# Altium PCB DT10966_MOTOR_CONTROLLER.PcbDoc (part 8 of 8)
Units mm, origin at the board's own origin, x right, y up, seen from the top; angles counter-clockwise.
Board outline 300 x 19 mm, 10 copper layers (Top Layer, Layer 2 GND, Layer 3 SIG, Layer 4 GND, Layer 5 PWR, Layer 6 PWR, Layer 7 GND, Layer 8 SIG, Layer 9 GND, Bottom Layer), stack 2.418 mm thick; 745 components, 446 nets, 2132 pads, 1222 vias.
Unrouted connection lines stored in the file: 3.
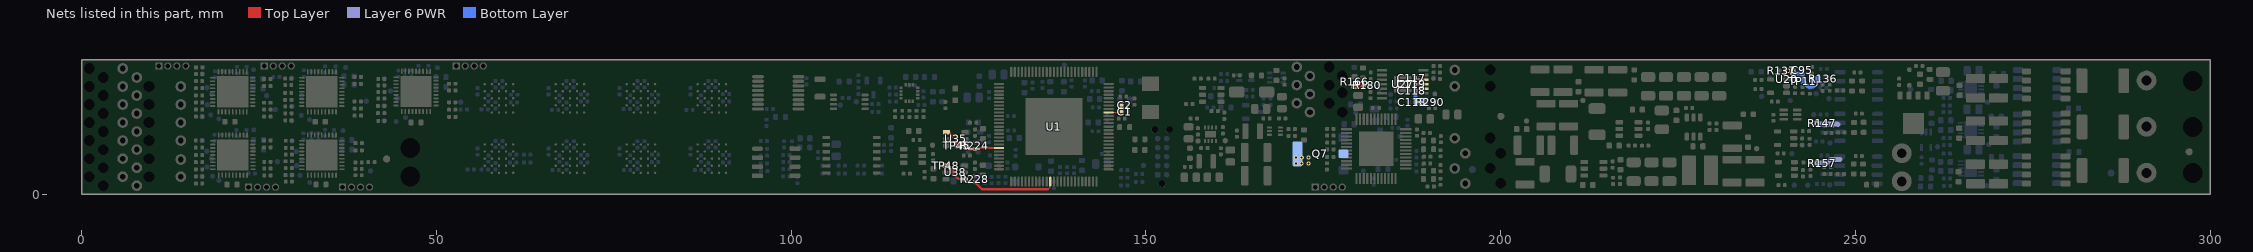
[diagram p15: the nets of this part, all layers, seen from the top]

## Via types
v1: diameter 0.6, hole 0.3, Top Layer to Bottom Layer, tented both sides, 726 vias
v2: diameter 0.4, hole 0.2, Top Layer to Bottom Layer, tented both sides, 493 vias
v3: diameter 0.5, hole 0.2, Top Layer to Bottom Layer, tented both sides, 3 vias

## Nets (pads, with @x,y where several pads share a name; then routed paths per layer and width w, separated by ;. In a path a pad name is that pad's centre, name@x,y a point inside that pad or via, vN(x,y) a via of type N, cw(c..) or ccw(c..) an arc to the next point about the centre after c; other vN are vias at no path point) (continued)
VPWR1: C113.2 C117.2 C118.2 C119.2 Q7.2 Q7.4 R166.2 R180.2 R290.1 U27.10 U27.11 U27.12 | length 10
  Top Layer w0.3: v1(187.901,15.5) 187.911,15.51 189.115,15.51 U27.11@189.126,15.52 ; v1(187.901,16.392) 187.982,16.392 188.176,16.198 189.098,16.198 U27.12@189.126,16.17 ; v1(187.958,14.6) 188.039,14.6 188.282,14.842 189.098,14.842 U27.10@189.126,14.87
  Top Layer w0.6: R166.2@179.345,15.154 R166.2@179.4,15.154 ; R166.2@179.397,15.151 179.46,15.214 179.65,15.214 179.699,15.263 R180.2@180.653,15.263
  Bottom Layer w0.6: v1(187.901,16.392) v1(187.901,16.392) 187.899,14.658 v1(187.958,14.6) 187.958,14.52 187.974,14.504 C113.2@187.974,12.967 R290.1@189.358,12.967
  other v1: 171.138,4.359 171.926,4.359 172.887,4.359 171.15,5.184 171.939,5.196 172.887,5.196 179.373,15.154 180.67,15.28
VREF: C95.2 R136.1 R137.2 R147.1 R157.1 TP11.1 U20.2 | length 14
  Top Layer w0.4: R137.2@240.03,17.423 v1(240.503,17.423) 240.976,17.423 241.166,17.233 v1(241.221,17.233)
  Layer 6 PWR w0.7: v1(244.563,9.947) 247.406,9.947 247.535,9.819 ; v1(244.647,4.457) 245.99,4.457 246.43,4.897 247.772,4.897
  Bottom Layer w0.6: v1(240.503,17.423) 241.221,17.423 v1(241.221,17.233) 241.221,17.133 241.321,17.033 C95.2@242.499,17.033 242.514,17.019 242.514,15.989 TP11.1@242.528,15.974 ; TP11.1@242.528,15.953 242.563,15.953 243.309,15.207 243.997,15.207 v1@244.375,15.586 ; v1@244.443,15.758 244.664,15.978 244.664,16.237 R136.1@244.724,16.297
  other v1: 244.305,15.515
VREFHIA: R224.2 TP45.1 U1.19 U35.1 U35.4 | length 9
  Top Layer w0.3: R224.2@125.896,6.402 125.901,6.402 126.036,6.537 U1.19@129.286,6.537
  Top Layer w0.4: U35.1@121.888,8.773 121.993,8.669 122.315,8.669 123.289,7.695 123.289,6.881 v1(123.327,6.843) U35.4@124.476,6.843 124.679,6.843 124.784,6.738 124.784,6.637 125.018,6.402 R224.2@125.896,6.402
VREFHIB: R228.2 TP48.1 U1.37 U38.1 U38.4 | length 17.3
  Top Layer w0.15: 136.205,0.714 136.504,1.013 136.504,1.805 U1.37@136.511,1.812
  Top Layer w0.3: v2(121.809,4.007) 121.809,4.042 U38.1@121.802,4.049 122.005,4.049 122.725,3.33 122.769,3.33 122.769,2.972 123.577,2.163 124.345,2.163 U38.4@124.39,2.119 124.594,2.119 125.011,1.702 R228.2@125.889,1.702 125.894,1.702 126.883,0.714 136.205,0.714
VSSOSC: C1.2 C2.2 U1.67 | length 2.7
  Top Layer w0.15: U1.67@144.736,11.537 144.765,11.566 146.449,11.566 146.542,11.659 C2.2@146.542,12.533
pads on no net: J1. J1.6 U1.13 U1.27 U1.28 U1.29 U1.30 U1.31 U1.32 U1.33 U1.42 U1.43 U2.A2 U2.A3 U2.A5 U2.B1 U2.B5 U2.C1 U2.C3 U2.C5 U2.D1 U2.D5 U2.E1 U2.E2 U2.E3 U2.E4 U2.E5 U3.A2 U3.A3 U3.A5 U3.B1 U3.B5 U3.C1 U3.C3 U3.C5 U3.D1 U3.D5 U3.E1 U3.E2 U3.E3 U3.E4 U3.E5 U4.A2 U4.A3 U4.A5 U4.B1 U4.B5 U4.C1 U4.C3 U4.C5 U4.D1 U4.D5 U4.E1 U4.E2 U4.E3 U4.E4 U4.E5 U5.A2 U5.A3 U5.A5 U5.B1 U5.B5 U5.C1 U5.C3 U5.C5 U5.D1 U5.D5 U5.E1 U5.E2 U5.E3 U5.E4 U5.E5 U7.A2 U7.A3 U7.A5 U7.B1 U7.B5 U7.C1 U7.C3 U7.C5 U7.D1 U7.D5 U7.E1 U7.E2 U7.E3 U7.E4 U7.E5 U8.A2 U8.A3 U8.A5 U8.B1 U8.B5 U8.C1 U8.C3 U8.C5 U8.D1 U8.D5 U8.E1 U8.E2 U8.E3 U8.E4 U8.E5 U9.A2 U9.A3 U9.A5 U9.B1 U9.B5 U9.C1 U9.C3 U9.C5 U9.D1 U9.D5 U9.E1 U9.E2 U9.E3 U9.E4 U9.E5 U10.A2 U10.A3 U10.A5 U10.B1 U10.B5 U10.C1 U10.C3 U10.C5 U10.D1 U10.D5 U10.E1 U10.E2 U10.E3 U10.E4 U10.E5 U12.5 U13.9 U14.1 U14.12 U14.13 U14.14 U19.4 U22.4 U25.4 U27.7 U27.8 U28.5 U28.6 U28.7 U28.8 U28.9 U28.17 U28.18 U28.19 U28.29 U28.30 U28.31 U28.32 U28.33 U28.34 U28.38 U28.39 U28.40 U28.41 U28.42 U29.7 U29.12 U29.24 U29.25 U29.26 U29.27 U29.33 U29.36 U39.7 U39.12 U39.24 U39.25 U39.26 U39.27 U39.33 U39.36 U40.7 U40.12 U40.24 U40.25 U40.26 U40.27 U40.33 U40.36 U41.7 U41.12 U41.24 U41.25 U41.26 U41.27 U41.33 U41.36 U42.7 U42.12 U42.24 U42.25 U42.26 U42.27 U42.33 U42.36 Z1.1 Z2.1 Z3.1 Z4.1 Z5.1 Z6.1

## Polygon pours and split planes (outlines as drawn)
DGND on Top Layer "DGND_L01_P104" (solid, remove dead copper, pour order 104): 169.598,19 179.682,19 179.682,0 169.599,0
DGND on Top Layer "DGND_L01_P078" (solid, remove dead copper, pour order 78): 0,19 154.995,19 155.332,18.663 155.332,-0.019 0.019,-0.019 0,0
DGND on Top Layer "DGND_3" (solid, remove dead copper, pour order 54): 154.594,19 154.594,0 172.089,0 172.089,19
GND on Top Layer "GND_L01_P080" (solid, remove dead copper, pour order 80): 201.406,19 201.464,18.942 201.464,0 178.281,0 181.033,2.752 181.033,19
NetC193_2 on Top Layer "NETC193" (solid, remove dead copper, pour order 0): 156.656,5.663 156.086,5.663 155.817,5.393 155.817,4.412 156.101,4.128 156.063,4.09 156.063,3.335 156.564,2.835 156.564,1.985 156.824,1.725 156.839,1.74 158.898,1.74 159.158,2 159.158,2.893 158.195,3.856 158.195,7.514 157.301,7.514 157.301,6.308
GND on Top Layer "GND_5" (solid, remove dead copper, pour order 64): 200.644,10.129 200.644,0 237.808,0 237.808,6.76 232.704,11.864 232.704,19 200.644,19
NetC173_1 on Top Layer "NETC173_1_L01_P002" (solid, remove dead copper, pour order 2): 216.698,9.514 216.68,9.531 212.964,9.531 212.201,8.768 212.212,8.758 212.212,7.515 213.452,6.275 215.654,6.275 215.654,8.23 216.338,8.914 216.698,8.914
DGND on Top Layer "DGND_2" (solid, remove dead copper, pour order 53): 202.581,19 219.384,19 219.384,16.851 219.403,16.832 218.282,16.832 218.282,11.623 215.11,8.451 205.441,8.451 202.581,11.31
VBAT on Top Layer "VBAT_L01_P017" (solid, remove dead copper, pour order 17): 260.924,11.585 260.907,2.793 263.7,0 278.124,0 278.124,6.382 271.183,6.382 270.002,5.201 263.938,5.185 263.767,5.356 263.767,8.31 263.983,8.526 263.767,11.585
VBAT on Top Layer "VBAT_L01_P016" (solid, remove dead copper, pour order 16): 263.979,14.231 263.979,11.428 264.217,11.19 269.73,11.19 270.83,12.29 278.064,12.29 278.064,9.389 275.713,7.037 273.127,7.037 273.127,7.362 271.936,8.553 265.216,8.553 263.724,8.553 260.924,11.353 260.924,12.924 260.625,13.286 261.513,14.231
GND on Top Layer "GND_3" (solid, remove dead copper, pour order 13): 264.078,1.922 264.364,2.209 270.124,2.209 270.882,2.967 273.007,2.967 273.007,0.951 272.871,0.815 265.185,0.815
GND on Top Layer "GND_4" (solid, remove dead copper, pour order 48): 258.831,16.525 262.941,16.525 263.303,16.887 263.303,17.985 262.886,18.402 259.241,18.402 258.824,17.985
GND on Top Layer "GND_2" (solid, remove dead copper, pour order 38): 264.143,8.063 264.43,8.349 270.19,8.349 270.597,8.756 273.072,8.756 273.072,7.091 272.715,6.734 264.462,6.734 264.148,7.049
GND on Top Layer "GND_1" (solid, remove dead copper, pour order 37): 264.198,14.074 264.485,14.36 270.245,14.36 270.651,14.767 273.127,14.767 273.127,13.102 272.77,12.745 264.517,12.745 264.203,13.06
VPWR on Top Layer "VPWR_1" (solid, remove dead copper, pour order 36): 202.068,5.15 203.098,5.15 204.018,6.07 204.018,8.112 203.271,8.859 203.271,9.489 203.949,9.489 205.162,8.276 207.511,8.276 207.511,2.613 206.576,1.678 205.808,1.678 205.808,1.689 204.157,3.34 202.942,3.34 202.068,4.215
+12V0 on Top Layer "+12V0_1" (solid, remove dead copper, pour order 35): 228.676,5.46 230.267,7.051 236.207,7.051 237.177,6.082 237.177,3.613 232.34,3.602 230.412,1.674 228.699,1.673 228.647,4.506
NetC160_1 on Top Layer "NETC160_1" (solid, remove dead copper, pour order 21): 226.865,8.552 226.865,7.635 225.51,6.279 225.51,2.595 227.465,2.595 227.465,6.362 227.475,6.371 227.465,7.635 227.465,8.552
VBAT on Top Layer "VBAT_1" (solid, remove dead copper, pour order 20): 231.675,14.584 231.675,13.403 231.113,12.841 226.61,12.841 226.21,12.441 226.515,12.135 226.515,10.422 226.499,10.422 226.364,10.287 225.978,10.287 224.825,11.44 223.811,11.44 223.496,11.125 222.237,11.125 220.975,9.864 218.983,9.864 218.983,10.464 219.256,10.737 219.256,14.023 219.799,14.566
+5V0 on Top Layer "+5V0_1" (solid, remove dead copper, pour order 3): 203.516,14.844 204.034,15.362 217.202,15.362 217.821,14.744 217.821,13.956 215.208,11.343 211.076,11.343 210.724,11.696 204.674,11.696 203.516,12.854
+3V3 on Top Layer "+3V3_DCDC" (solid, remove dead copper, pour order 19): 159.695,7.771 160.065,7.771 160.555,8.26 160.555,8.765 160.595,8.806 160.61,8.79 161.663,8.79 162.075,8.378 163.09,8.378 163.52,8.808 163.52,9.808 163.71,9.998 164.427,9.998 164.427,1.777 164.136,1.486 163.378,1.486 163.378,4.711 162.355,5.734 161.201,5.734 160.654,6.282 159.695,7.241
VBAT on Top Layer "VBAT_L01_P015" (solid, remove dead copper, pour order 15): 256.943,15.667 257.308,16.032 259.468,16.032 262.751,16.032 264.295,17.577 270.206,17.577 271.129,18.5 278.127,18.5 278.127,15.434 275.88,13.187 273.13,13.187 273.13,13.357 271.52,14.967 266.636,14.967 266.29,14.621 266.267,14.644 264.424,14.644 262.551,12.77 256.943,12.77
VIN on Top Layer "VIN_L01_P018" (solid, remove dead copper, pour order 18): 255.831,8.271 255.1,7.54 255.1,5.793 257.9,5.793 260.1,7.993 260.1,8.22
NetC70_1 on Top Layer "NETC70_1_L01_P011" (solid, remove dead copper, pour order 11): 278.891,16.612 279.691,16.612 280.732,17.653 282.09,17.653 282.09,14.621 280.668,13.199 278.891,13.199
NetC85_1 on Top Layer "NETC85_1_L01_P014" (solid, remove dead copper, pour order 14): 278.966,4.502 280.423,4.502 281.013,5.092 281.028,5.076 281.699,5.076 281.699,1.477 281.39,1.168 278.963,1.168
NetR149_2 on Top Layer "NETR149_2_L01_P010" (solid, remove dead copper, pour order 10): 287.775,5.104 290.836,5.104 291.99,3.951 291.99,2.635 290.989,1.635 287.775,1.635
NetR129_2 on Top Layer "NETR129_2_L01_P009" (solid, remove dead copper, pour order 9): 287.775,17.756 291.261,17.756 291.99,17.027 291.99,15.052 291.194,14.256 287.775,14.256
NetR139_2 on Top Layer "NETR139_2_L01_P006" (solid, remove dead copper, pour order 6): 287.775,11.256 291.261,11.256 291.99,10.527 291.99,8.552 291.194,7.756 287.775,7.756
NetC77_1 on Top Layer "NETC77_1_L01_P004" (solid, remove dead copper, pour order 4): 278.885,10.513 280.082,10.513 280.788,11.219 282.054,11.219 282.054,8.063 281.132,7.141 278.864,7.141
DGND on Layer 8 SIG "DGND_L08_P090" (solid, remove dead copper, pour order 90): 0,19 179.047,19 179.047,0 0,0
AGND on Layer 8 SIG "AGND_L08_P088" (solid, remove dead copper, pour order 88): 115.379,7.503 118.413,10.537 118.413,10.65 126.886,10.65 194.307,10.65 197.183,13.526 234.753,13.526 234.753,5.443 155.117,5.443 152.143,2.208 133.589,2.208 132.661,1.237 118.744,1.237 115.379,4.991
GND on Layer 8 SIG "GND_L08_P095" (solid, remove dead copper, pour order 95): 217.504,18.737 300,18.737 300,0 179.982,0 179.982,18.736
CVAGND on Layer 8 SIG "CVAGND_L08_P087" (solid, remove dead copper, pour order 87): 235.104,18.196 253.911,18.196 253.911,2.794 249.646,2.794 246.213,0.624 235.104,0.624
GND on Bottom Layer "GND_L10_P093" (solid, remove dead copper, pour order 93): 217.504,18.737 300,18.737 300,0 179.982,0 179.982,18.736
CVAGND on Bottom Layer "CVAGND_L10_P091" (solid, remove dead copper, pour order 91): 235.104,18.056 253.911,18.056 253.911,2.794 247.703,2.794 244.987,1.078 235.104,1.078
DGND on Bottom Layer "DGND_L10_P094" (solid, remove dead copper, pour order 94): 0,19 179.047,19 179.047,0 0,0
AGND on Bottom Layer "AGND_L10_P092" (solid, remove dead copper, pour order 92): 115.379,7.616 118.413,10.65 126.886,10.65 194.307,10.65 197.183,13.526 234.753,13.526 234.753,5.443 155.117,5.443 152.143,2.208 133.589,2.208 132.661,1.237 118.744,1.237 115.379,4.991
PGND on Bottom Layer "PGND_4" (solid, remove dead copper, pour order 56): 265.08,17.933 265.08,3.473 260.148,3.473 260.148,0 264.978,0 267.099,2.122 267.099,17.932
VPWR1 on Bottom Layer "VPWR1_1" (solid, remove dead copper, pour order 31): 170.619,7.458 171.523,8.362 175.555,8.362 177.609,6.308 178.129,6.308 178.129,5.108 177.609,5.108 175.405,2.904 171.673,2.904 170.619,3.958
GND on Bottom Layer "GND_13" (solid, remove dead copper, pour order 59): 273.37,4.536 273.365,4.531 273.365,1.183 273.083,0.9 270.364,0.9 270.219,1.045 270.227,1.053 270.227,3.766 271.008,4.547
GND on Bottom Layer "GND_12" (solid, remove dead copper, pour order 58): 273.434,10.347 273.429,10.342 273.429,6.874 273.216,6.66 270.689,6.66 270.35,7 270.362,7.012 270.362,9.745 270.964,10.347
GND on Bottom Layer "GND_11" (solid, remove dead copper, pour order 57): 273.39,16.662 273.39,13.365 272.745,12.72 270.641,12.72 270.362,12.999 270.362,16.251 270.773,16.662
NetC85_1 on Bottom Layer "NETC85_1_L10_P008" (solid, remove dead copper, pour order 8): 275.094,5.756 275.106,5.743 278.314,5.743 279.476,4.581 280.403,4.581 280.403,4.599 280.881,5.076 282.554,5.076 282.554,1.882 281.834,1.162 275.177,1.162
NetC70_1 on Bottom Layer "NETC70_1_L10_P007" (solid, remove dead copper, pour order 7): 275.113,17.915 278.388,17.915 279.444,16.86 282.484,16.86 282.484,14.503 281.264,13.283 275.179,13.283
NetC77_1 on Bottom Layer "NETC77_1_L10_P005" (solid, remove dead copper, pour order 5): 274.85,11.578 278.353,11.578 279.452,10.478 279.487,10.513 280.175,10.513 280.881,11.219 282.553,11.219 282.553,8.036 281.654,7.137 274.85,7.137
DGND on Layer 6 PWR "DGND_L06_P083" (solid, remove dead copper, pour order 83): 246.688,3.239 251.374,3.239 251.614,2.998 251.614,0.019 246.688,0.015
GND on Layer 6 PWR "GND_L06_P084" (solid, remove dead copper, pour order 84): 218.254,19 300,19 300,0 251.736,0 251.736,1.95 245.947,7.739 218.254,7.739
DGND on Layer 6 PWR "DGND_L06_P082" (solid, remove dead copper, pour order 82): -0.019,19.019 219.384,19.019 219.384,16.851 218.263,16.851 217.889,16.476 217.889,0.019 179.301,0.019 -0.019,0.019
+3V3 on Layer 6 PWR "+3V3_L06_P022" (solid, remove dead copper, pour order 22): 246.463,0 246.463,1.665 246.477,13.759 245.902,14.182 238.81,14.179 237.891,13.388 237.891,7.447 201.279,7.447 199.232,9.536 197.863,9.523 196.11,7.46 164.42,7.447 164.42,10.599 160.106,14.914 146.294,14.914 144.741,16.467 131.441,16.467 129.729,14.755 102.35,14.755 98.497,10.901 98.509,10.889 98.509,3.525 102.034,0
+5V0 on Layer 6 PWR "+5V0_L06_P025" (solid, remove dead copper, pour order 25): 164.706,14.909 164.706,7.562 217.656,7.562 217.656,14.909
+5V0 on Layer 6 PWR "+5V0_L06_P029" (solid, remove dead copper, pour order 29): 27.01,16.262 29.748,19 162.296,19 167.481,13.815 167.554,9.445 166.014,9.486 160.512,14.987 146.601,14.965 144.736,16.587 131.405,16.581 129.815,14.965 50.045,14.987 42.052,6.995 27.555,7.053 27.01,7.598
VREF on Layer 6 PWR "VREF_L06_P034" (solid, remove dead copper, pour order 34): 240.27,18.994 240.274,14.303 245.957,14.303 246.772,13.489 246.772,4.113 247.972,4.113 248.815,4.955 248.815,16.353 246.168,19
DGND on Layer 5 PWR "DGND_L05_P086" (solid, remove dead copper, pour order 86): 0,19 179.047,19 179.047,0 0,0
VDD_FLASH on Layer 5 PWR "VDD_FLASH_L05_P030" (solid, remove dead copper, pour order 30): 54.259,3.283 54.116,3.394 54.116,13.944 56.697,16.525 92.754,16.525 96.992,12.287 96.969,7.608 96.265,6.964 89.582,6.964 85.901,3.283
GND on Layer 5 PWR "GND_L05_P085" (solid, remove dead copper, pour order 85): 217.504,18.737 300,18.737 300,0 179.982,0 179.982,18.736
VDD_1V2 on Layer 5 PWR "VDD_1V2_L05_P027" (solid, remove dead copper, pour order 27): 136.701,3.14 136.653,3.187 133.451,3.187 132.235,4.404 132.235,6.34 132.226,6.34 130.635,7.931 131.295,8.591 131.295,11.137 129.967,12.464 129.967,14.373 132.046,16.452 142.582,16.452 143.118,15.915 143.118,13.862 145.015,11.965 145.015,8.42 145.643,7.931 156.019,7.931 156.679,7.497 156.683,4.837 155.883,4.09 144.03,4.09 142.966,3.025 142.895,3.097 137.052,3.097
VPWR on Layer 5 PWR "VPWR_L05_P033" (solid, pour order 33): 203.418,4.05 203.433,4.034 206.1,4.034 207.511,5.444 207.511,8.08 206.93,8.661 204.719,8.661 204.719,8.727 199.75,13.696 191.3,13.696 190.733,13.129 190.733,12.436 199.058,4.111
VBAT on Layer 5 PWR "VBAT_L05_P023" (solid, remove dead copper, pour order 23): 218.055,19 257.55,19 257.55,17.95 260.924,14.576 260.924,11.095 258.478,8.65 229.242,8.65 224.414,3.821 218.788,3.821 218.055,4.555
VDDA_MCU on Layer 5 PWR "VDDA_MCU_L05_P052" (solid, remove dead copper, pour order 52): 126.465,6.975 127.177,7.687 129.718,7.687 135.593,1.812 137.361,1.812 137.361,0.044 137.405,0 127.821,0 126.465,1.356
+12V0 on Layer 5 PWR "+12V0_L05_P024" (solid, remove dead copper, pour order 24): 266.54,17.933 268.355,17.933 268.355,6.887 265.831,4.364 236.836,4.364 230.962,4.364 230.962,5.51 234.003,8.551 258.835,8.551 266.54,16.256
VPWR1 on Layer 5 PWR "VPWR1_L05_P032" (solid, remove dead copper, pour order 32): 189.126,18.133 189.126,14.022 181.384,6.28 175.8,6.28 173.786,4.267 173.02,3.5 171.196,3.5 170.09,4.606 170.09,7.894 181.211,19.015 188.258,19
BAT_RTC on Layer 5 PWR "BAT_RTC_L05_P081" (solid, remove dead copper, pour order 81): 168.327,18.997 169.157,18.166 169.157,17.355 142.146,17.355 141.792,17.715 131.327,17.715 114.767,17.715 114.767,19.001
AVDD on Layer 5 PWR "AVDD_L05_P079" (solid, remove dead copper, pour order 79): 175.477,5.02 182.966,5.02 187.236,9.29 187.236,10.865 180.553,10.865 175.477,5.681
GND on Layer 2 GND "GND_L02_P072" (solid, remove dead copper, pour order 72): 218.254,19 300,19 300,0 251.736,0 251.736,1.95 246.947,6.739 222.992,6.739 218.281,11.45
DGND on Layer 2 GND "DGND_L02_P068" (solid, remove dead copper, pour order 68): 0,19 219.403,19 219.403,16.832 218.282,16.832 217.907,16.457 217.907,0 179.32,0 0,0
PSGND4 on Layer 2 GND "PSGND4_L02_P045" (solid, remove dead copper, pour order 45): 28.293,7.447 29.035,8.189 35.401,8.189 40.333,3.257 40.333,1.522 28.751,1.522 28.293,1.981
DGND on Layer 2 GND "DGND_L02_P069" (solid, remove dead copper, pour order 69): 215.503,13.579 222.72,6.362 246.354,6.362 251.614,1.101 251.614,0 217.525,0 209.725,7.801
PSGND2 on Layer 2 GND "PSGND2_L02_P065" (solid, remove dead copper, pour order 65): 15.653,7.441 16.63,8.419 23.46,8.419 26.578,5.301 26.578,1.302 15.901,1.302 15.653,1.55
PSGND3 on Layer 2 GND "PSGND3_L02_P062" (solid, remove dead copper, pour order 62): 28.293,17.109 28.46,17.276 36.1,17.276 37.683,15.693 37.683,14.118 33.678,10.114 28.541,10.114 28.293,10.362
PSGND1 on Layer 2 GND "PSGND1_L02_P066" (solid, remove dead copper, pour order 66): 15.894,17.054 16.445,17.605 22.275,17.605 23.451,16.429 23.451,12.554 21.634,10.737 16.06,10.737 15.894,10.904
PSGND5 on Layer 2 GND "PSGND5_L02_P039" (solid, remove dead copper, pour order 39): 41.462,16.319 41.99,16.847 49.269,16.847 49.269,16.842 50.851,15.26 50.851,14.184 46.846,10.18 41.71,10.18 41.462,10.428
AGND on Layer 2 GND "AGND_L02_P067" (solid, remove dead copper, pour order 67): 115.379,4.991 115.379,7.503 118.54,10.664 121.945,10.664 123.072,9.145 125.057,9.145 126.134,10.664 126.872,10.664 133.819,3.717 135.215,3.717 135.806,3.126 135.806,1.131 126.466,1.131 124.963,2.634 117.492,2.634
GND on Layer 9 GND "GND_L09_P074" (solid, remove dead copper, pour order 74): 217.504,18.737 300,18.737 300,0 179.982,0 179.982,18.736
DGND on Layer 9 GND "DGND_L09_P075" (solid, remove dead copper, pour order 75): 0,19 179.047,19 179.047,0 0,0
AGND on Layer 9 GND "AGND_L09_P055" (solid, remove dead copper, pour order 55): 115.379,7.503 118.413,10.537 118.413,10.65 126.886,10.65 194.307,10.65 197.183,13.526 234.753,13.526 234.753,5.443 155.117,5.443 152.143,2.208 133.589,2.208 132.661,1.237 118.744,1.237 115.379,4.991
PSGND4 on Layer 9 GND "PSGND4_L09_P043" (solid, remove dead copper, pour order 43): 28.274,7.466 29.016,8.208 35.382,8.208 37.59,6 37.59,5.152 33.979,1.541 28.733,1.541 28.274,2
CVAGND on Layer 9 GND "CVAGND_L09_P047" (solid, remove dead copper, pour order 47): 235.104,18.056 253.911,18.056 253.911,2.794 247.703,2.794 244.987,1.078 235.104,1.078
PSGND3 on Layer 9 GND "PSGND3_L09_P044" (solid, remove dead copper, pour order 44): 28.274,16.272 29.297,17.295 36.081,17.295 37.664,15.712 37.664,14.137 33.659,10.133 28.522,10.133 28.274,10.381
PSGND2 on Layer 9 GND "PSGND2_L09_P042" (solid, remove dead copper, pour order 42): 15.634,7.46 16.611,8.437 23.441,8.437 25.023,6.855 25.023,5.326 21.019,1.321 15.882,1.321 15.634,1.569
PSGND1 on Layer 9 GND "PSGND1_L09_P041" (solid, remove dead copper, pour order 41): 15.875,17.073 16.426,17.624 22.257,17.624 23.432,16.448 23.432,12.573 21.615,10.756 16.041,10.756 15.875,10.922
PSGND5 on Layer 9 GND "PSGND5_L09_P040" (solid, remove dead copper, pour order 40): 41.443,16.338 41.971,16.866 49.25,16.866 49.25,16.861 50.832,15.278 50.832,14.203 46.828,10.199 41.691,10.199 41.443,10.447
GND on Layer 7 GND "GND_L07_P073" (solid, remove dead copper, pour order 73): 218.254,19 300,19 300,0 251.736,0 251.736,1.95 246.947,6.739 222.992,6.739 218.281,11.45
DGND on Layer 7 GND "DGND_L07_P070" (solid, remove dead copper, pour order 70): -0.019,19.019 219.384,19.019 219.384,16.851 218.263,16.851 217.889,16.476 217.889,0.019 179.301,0.019 -0.019,0.019
PGND on Layer 7 GND "PGND_L07_P060" (solid, remove dead copper, pour order 60): 265.253,17.972 266.541,17.972 269.292,15.221 269.292,2.424 268.59,1.721 265.974,1.721 265.974,0 261.006,0 259.123,2.76 259.123,16.089 261.006,17.972
DGND on Layer 7 GND "DGND_L07_P071" (solid, remove dead copper, pour order 71): 215.484,13.598 223.054,6.028 246.688,6.028 251.125,1.591 251.125,0.019 217.507,0.019 209.706,7.82
RSGND on Layer 7 GND "RSGND_L07_P051" (solid, remove dead copper, pour order 51): 177.182,7.456 183.06,13.334 185.76,13.334 188.986,10.108 188.986,1.465 186.602,1.452 185.208,2.21 177.182,2.21
GND on Layer 4 GND "GND_L04_P049" (solid, remove dead copper, pour order 49): 217.504,18.737 300,18.737 300,0 179.982,0 179.982,18.736
DGND on Layer 4 GND "DGND_L04_P063" (solid, remove dead copper, pour order 63): 0,19 179.047,19 179.047,0 0,0
GND on Layer 3 SIG "GND_L03_P103" (solid, remove dead copper, pour order 103): 218.254,19 300,19 300,0 251.736,0 251.736,1.95 246.947,6.739 222.992,6.739 218.254,11.533
DGND on Layer 3 SIG "DGND_L03_P101" (solid, remove dead copper, pour order 101): 0,19 219.403,19 219.403,16.832 218.282,16.832 217.907,16.457 217.907,0 179.32,0 0,0
PSGND4 on Layer 3 SIG "PSGND4_L03_P097" (solid, remove dead copper, pour order 97): 27.343,6.497 29.035,8.189 35.401,8.189 40.333,3.257 40.333,1.522 28.751,1.522 27.343,2.931
PSGND2 on Layer 3 SIG "PSGND2_L03_P099" (solid, remove dead copper, pour order 99): 15.653,7.441 16.63,8.419 23.46,8.419 26.578,5.301 26.578,1.302 15.901,1.302 15.653,1.55
PSGND1 on Layer 3 SIG "PSGND1_L03_P100" (solid, remove dead copper, pour order 100): 15.894,17.054 16.445,17.605 22.275,17.605 23.451,16.429 23.451,12.554 21.634,10.737 16.06,10.737 15.894,10.904
PSGND3 on Layer 3 SIG "PSGND3_L03_P098" (solid, remove dead copper, pour order 98): 28.293,17.109 28.46,17.276 36.1,17.276 37.683,15.693 37.683,14.118 33.678,10.114 28.541,10.114 28.293,10.362
PSGND5 on Layer 3 SIG "PSGND5_L03_P096" (solid, remove dead copper, pour order 96): 41.462,16.319 41.99,16.847 49.269,16.847 49.269,16.842 50.851,15.26 50.851,14.184 46.846,10.18 41.71,10.18 41.462,10.428
DGND on Layer 3 SIG "DGND_L03_P102" (solid, remove dead copper, pour order 102): 215.503,13.579 223.073,6.01 246.706,6.01 251.144,1.572 251.144,0 217.525,0 209.725,7.801

## Keep-outs
Keep-Out Layer:
  lines w0.01: 0,19 0,0 300,0 ; 0,19 0,19 ; 0,19 300,19 300,0 ; 300,0 300,0

## Other copper
Top Layer:
  rectangle net VBAT: 273.437,1.317 278.134,18.409
  pour cut-out: 86.38,7.225 86.655,7.5 91.286,7.5 91.456,7.33 91.456,2.85 91.161,2.555 86.705,2.555 86.705,2.565 86.359,2.911
  pour cut-out: 76.38,7.225 76.655,7.5 81.286,7.5 81.457,7.329 81.457,2.85 81.161,2.555 76.705,2.555 76.705,2.564 76.359,2.91
  pour cut-out: 66.38,7.225 66.655,7.5 71.286,7.5 71.457,7.329 71.457,2.85 71.161,2.555 66.705,2.555 66.705,2.564 66.359,2.91
  pour cut-out: 56.38,7.225 56.655,7.5 61.286,7.5 61.457,7.329 61.457,2.85 61.161,2.555 56.705,2.555 56.705,2.564 56.359,2.91
  pour cut-out: 86.38,15.725 86.655,16 91.286,16 91.457,15.829 91.457,11.35 91.161,11.055 86.705,11.055 86.705,11.064 86.359,11.41
  pour cut-out: 76.38,15.725 76.655,16 81.286,16 81.457,15.829 81.457,11.35 81.161,11.055 76.705,11.055 76.705,11.064 76.359,11.41
  pour cut-out: 66.38,15.725 66.655,16 71.286,16 71.457,15.829 71.457,11.35 71.161,11.055 66.705,11.055 66.705,11.064 66.359,11.41
  pour cut-out: 56.38,15.725 56.655,16 61.286,16 61.457,15.829 61.457,11.35 61.161,11.055 56.705,11.055 56.705,11.064 56.359,11.41
  region net GND: 252.786,1.779 254.052,3.044 256.833,3.044 256.833,0.904 256.411,0.482 253.253,0.482 252.786,0.949
  region net DGND: 251.736,1.779 251.736,0.949 251.574,0.949 250.889,0.264 248.815,0.264 248.815,1.514 249.108,1.779
  pour cut-out: 227.272,6.338 227.355,6.256 229.471,6.256 228.606,5.39 228.606,1.139 227.378,1.139
  pour cut-out: 206.703,4.24 209.889,4.24 209.889,1.558 206.71,1.558
  region net NetC159_1: 212.167,3.924 211.337,3.924 211.183,4.078 209.889,4.078 209.889,2.257 211.264,0.883 211.755,0.883 211.755,1.753 211.527,1.753 210.889,2.39 210.889,3.053 211.16,3.324 212.167,3.324
  region net VBAT: 214.452,4.874 214.774,5.196 224.419,5.196 224.419,3.816 224.414,3.821 217.747,3.821 217.194,4.374 215.562,4.374 215.461,4.274 214.452,4.274
  region net +5V0: 167.039,9.493 167.039,12.037 167.305,12.037 168.171,11.171 168.152,11.152 168.152,9.991 167.643,9.482
  region net VDD_1V2: 155.576,8.354 156.426,8.354 156.686,8.094 156.686,6.408 156.414,6.136 155.641,6.136 155.316,6.461 155.316,7.834
  region net NetL6_1: 159.181,7.487 159.198,5.369 159.491,5.076 159.87,5.076 159.87,6.83
  region net NetL5_1: 165.776,9.976 166.409,9.976 166.856,9.53 166.856,8.299 166.352,7.795 165.757,7.795
Layer 2 GND:
  region net VBAT: 256.685,15.09 256.692,14.744 257.175,13.319 257.507,12.987 260.346,12.987 260.346,13.974 259.87,14.45 259.87,15.612 259.469,16.012 257.097,16.012
  region net NetC85_1: 278.861,4.353 280.569,4.353 281.293,5.076 282.539,5.076 282.539,1.889 281.818,1.168 279.227,1.168 278.861,1.535
  region net NetC77_1: 278.92,10.443 280.62,10.443 281.396,11.219 282.554,11.219 282.554,8.03 282.058,7.534 278.92,7.534
  region net NetC70_1: 278.931,16.227 281.005,16.217 281.413,16.637 282.09,16.932 282.493,16.932 282.493,15.258 282.493,14.524 280.805,13.556 278.931,13.556
  region net VBAT: 257.166,15.493 257.239,15.567 259.243,15.567 259.405,15.406 259.405,14.362 259.628,14.139 260.176,14.139 260.312,14.003 260.312,13.81 260.147,13.645 257.423,13.645 257.166,13.902
Layer 9 GND:
  region net NetC70_1: 278.931,16.227 281.005,16.217 281.413,16.637 282.09,16.932 282.493,16.932 282.493,15.258 282.493,14.524 280.805,13.556 278.931,13.556
  region net NetC77_1: 278.92,10.443 280.62,10.443 281.396,11.219 282.554,11.219 282.554,8.03 282.058,7.534 278.92,7.534
  region net NetC85_1: 278.861,4.353 280.569,4.353 281.293,5.076 282.539,5.076 282.539,1.889 281.818,1.168 279.227,1.168 278.861,1.535
  region net VBAT: 256.685,15.09 256.692,14.744 257.175,13.319 257.507,12.987 260.346,12.987 260.346,13.974 259.87,14.45 259.87,15.612 259.469,16.012 257.097,16.012
  region net DGND: 248.842,1.515 250.518,1.515 250.839,0.931 250.839,0.541 249.413,0.541
Layer 5 PWR:
  region net NetC70_1: 278.931,16.227 281.005,16.217 281.413,16.637 282.09,16.932 282.493,16.932 282.493,15.258 282.493,14.524 280.805,13.556 278.931,13.556
  region net NetC77_1: 278.92,10.443 280.62,10.443 281.396,11.219 282.554,11.219 282.554,8.03 282.058,7.534 278.92,7.534
  region net NetC85_1: 278.861,4.353 280.569,4.353 281.293,5.076 282.539,5.076 282.539,1.889 281.818,1.168 279.227,1.168 278.861,1.535
  region net VBAT: 256.685,15.09 256.692,14.744 257.175,13.319 257.507,12.987 260.346,12.987 260.346,13.974 259.87,14.45 259.87,15.612 259.469,16.012 257.097,16.012
  region net DGND: 248.815,1.514 249.131,1.831 250.195,1.831 251.144,0.882 251.144,0.378 248.815,0.378
Layer 6 PWR:
  region net NetC70_1: 278.931,16.227 281.005,16.217 281.413,16.637 282.09,16.932 282.493,16.932 282.493,15.258 282.493,14.524 280.805,13.556 278.931,13.556
  region net NetC77_1: 278.92,10.443 280.62,10.443 281.396,11.219 282.554,11.219 282.554,8.03 282.058,7.534 278.92,7.534
  region net NetC85_1: 278.861,4.353 280.569,4.353 281.293,5.076 282.539,5.076 282.539,1.889 281.818,1.168 279.227,1.168 278.861,1.535
  region net VBAT: 256.685,15.09 256.692,14.744 257.175,13.319 257.507,12.987 260.346,12.987 260.346,13.974 259.87,14.45 259.87,15.612 259.469,16.012 257.097,16.012
  region net DGND: 248.815,1.514 249.131,1.831 250.195,1.831 251.144,0.882 251.144,0.378 248.815,0.378
Layer 4 GND:
  region net NetC70_1: 278.931,16.227 281.005,16.217 281.413,16.637 282.09,16.932 282.493,16.932 282.493,15.258 282.493,14.524 280.805,13.556 278.931,13.556
  region net NetC77_1: 278.92,10.443 280.62,10.443 281.396,11.219 282.554,11.219 282.554,8.03 282.058,7.534 278.92,7.534
  region net NetC85_1: 278.861,4.353 280.569,4.353 281.293,5.076 282.539,5.076 282.539,1.889 281.818,1.168 279.227,1.168 278.861,1.535
  region net VBAT: 256.685,15.09 256.692,14.744 257.175,13.319 257.507,12.987 260.346,12.987 260.346,13.974 259.87,14.45 259.87,15.612 259.469,16.012 257.097,16.012
  region net DGND: 248.842,1.515 250.518,1.515 250.839,0.931 250.839,0.541 249.413,0.541
Layer 7 GND:
  region net NetC70_1: 278.931,16.227 281.005,16.217 281.413,16.637 282.09,16.932 282.493,16.932 282.493,15.258 282.493,14.524 280.805,13.556 278.931,13.556
  region net NetC77_1: 278.92,10.443 280.62,10.443 281.396,11.219 282.554,11.219 282.554,8.03 282.058,7.534 278.92,7.534
  region net NetC85_1: 278.861,4.353 280.569,4.353 281.293,5.076 282.539,5.076 282.539,1.889 281.818,1.168 279.227,1.168 278.861,1.535
  region net VBAT: 256.685,15.09 256.692,14.744 257.175,13.319 257.507,12.987 260.346,12.987 260.346,13.974 259.87,14.45 259.87,15.612 259.469,16.012 257.097,16.012
Layer 3 SIG:
  region net NetC70_1: 278.931,16.227 281.005,16.217 281.413,16.637 282.09,16.932 282.493,16.932 282.493,15.258 282.493,14.524 280.805,13.556 278.931,13.556
  region net NetC77_1: 278.92,10.443 280.62,10.443 281.396,11.219 282.554,11.219 282.554,8.03 282.058,7.534 278.92,7.534
  region net NetC85_1: 278.861,4.353 280.569,4.353 281.293,5.076 282.539,5.076 282.539,1.889 281.818,1.168 279.227,1.168 278.861,1.535
  region net VBAT: 256.685,15.09 256.692,14.744 257.175,13.319 257.507,12.987 260.346,12.987 260.346,13.974 259.87,14.45 259.87,15.612 259.469,16.012 257.097,16.012
  region net DGND: 248.815,1.514 249.131,1.831 250.195,1.831 251.144,0.882 251.144,0.378 248.815,0.378
Layer 8 SIG:
  region net NetC70_1: 278.931,16.227 281.005,16.217 281.413,16.637 282.09,16.932 282.493,16.932 282.493,15.258 282.493,14.524 280.805,13.556 278.931,13.556
  region net NetC77_1: 278.92,10.443 280.62,10.443 281.396,11.219 282.554,11.219 282.554,8.03 282.058,7.534 278.92,7.534
  region net NetC85_1: 278.861,4.353 280.569,4.353 281.293,5.076 282.539,5.076 282.539,1.889 281.818,1.168 279.227,1.168 278.861,1.535
  region net VBAT: 256.685,15.09 256.692,14.744 257.175,13.319 257.507,12.987 260.346,12.987 260.346,13.974 259.87,14.45 259.87,15.612 259.469,16.012 257.097,16.012
  region net DGND: 248.815,1.514 249.131,1.831 250.195,1.831 251.144,0.882 251.144,0.378 248.815,0.378
Bottom Layer:
  rectangle net GND: 272.858,1.539 274.069,4.536
  rectangle net GND: 272.877,7.437 273.983,10.392
  rectangle net GND: 272.877,13.697 274.059,16.662
  region net VBAT: 256.862,15.133 256.862,13.703 257.46,13.105 260.071,13.105 260.071,13.922 260.072,13.923 259.777,14.218 259.777,15.357 259.122,16.012 257.254,16.012
  pour cut-out: 151.637,8.251 152.907,8.251 152.907,2.384 151.637,2.384
  region net DGND: 248.815,1.514 249.131,1.831 250.195,1.831 251.144,0.882 251.144,0.378 248.815,0.378
  region net VBAT: 257.418,15.667 257.453,15.702 259.124,15.702 259.616,15.211 259.616,14.533 260.014,14.135 260.283,14.135 260.283,13.707 260.209,13.633 257.525,13.633 257.252,13.906 257.3,13.954 257.3,15.542

## Silkscreen, mask and mechanical layers (free items; w line width, h text height)
Top Overlay:
  lines w0.127: 112.503,9.126 114.263,9.126 114.671,9.534 114.671,10.231 114.675,10.236 115.853,10.236 115.853,10.362 ; 114.951,10.228 114.951,10.315 ; 116.492,10.372 116.492,10.245 119.15,10.245 119.23,10.326 119.23,12.143 ; 117.661,10.311 117.661,10.359 ; 118.661,12.332 119.166,12.837 119.166,12.856 ; 173.765,9.206 174.522,9.206 174.964,8.764 ; 175.041,4.764 175.129,4.851 ; 175.083,7.791 175.153,7.72
  lines w0.15: 8.823,0.994 9.859,0.994 ; 8.93,3.771 9.966,3.771 ; 8.93,6.311 9.966,6.311 ; 8.93,8.851 9.966,8.851 ; 8.93,11.391 9.966,11.391 ; 8.93,13.931 9.966,13.931 ; 8.93,16.471 9.966,16.471 ; 161.629,8.308 161.807,8.486 161.807,8.964 ; 170.249,16.92 170.249,16.91 170.755,16.404 ; 212.411,13.354 215.362,13.354
  text ".DT_PCB_Number / .DT_SCH_Title / Rev.DT_PCB_Revision" at 106.365,15.019 h0.8
Bottom Overlay:
  lines w0.15: 24.754,17.285 24.843,17.196 25.912,17.196 26.365,16.743 26.365,16.179 26.66,15.884 ; 50.839,17.743 51.658,17.743 52.094,17.307 52.094,17.286 ; 244.622,2.583 244.637,2.583 245.178,2.043 245.909,2.043 246.057,1.895 ; 261.381,7.369 261.381,11.795
Mechanical 1:
  the board outline again, w0.2

## Dimensions
0,0 to 300,0 on Fab Notes
0,0 to 0,19 on Fab Notes

## Text inside footprints (layer, text, board x,y; h text height)
U2: Top Assembly "A" at 87.456,0.72 h1.27 r90; Top Assembly "E" at 91.456,0.72 h1.27 r90; Top Assembly "1" at 84.135,3.673 h1.27 r180; Top Assembly "5" at 84.135,7.673 h1.27 r180; Top Overlay "A" at 86.662,0.72 h1.27; Top Overlay "E" at 90.599,0.593 h1.27; Top Overlay "1" at 83.741,2.879 h1.27; Top Overlay "5" at 83.614,6.816 h1.27
U3: Top Assembly "5" at 84.135,16.172 h1.27 r180; Top Assembly "1" at 84.135,12.172 h1.27 r180; Top Assembly "E" at 91.456,9.219 h1.27 r90; Top Assembly "A" at 87.456,9.219 h1.27 r90; Top Overlay "5" at 83.614,15.315 h1.27; Top Overlay "1" at 83.741,11.378 h1.27; Top Overlay "E" at 90.599,9.092 h1.27; Top Overlay "A" at 86.662,9.219 h1.27
U4: Top Assembly "A" at 77.456,0.719 h1.27 r90; Top Assembly "E" at 81.456,0.719 h1.27 r90; Top Assembly "1" at 74.135,3.672 h1.27 r180; Top Assembly "5" at 74.135,7.672 h1.27 r180; Top Overlay "A" at 76.662,0.719 h1.27; Top Overlay "E" at 80.599,0.592 h1.27; Top Overlay "1" at 73.741,2.878 h1.27; Top Overlay "5" at 73.614,6.815 h1.27
U5: Top Assembly "5" at 74.135,16.172 h1.27 r180; Top Assembly "1" at 74.135,12.172 h1.27 r180; Top Assembly "E" at 81.456,9.219 h1.27 r90; Top Assembly "A" at 77.456,9.219 h1.27 r90; Top Overlay "5" at 73.614,15.315 h1.27; Top Overlay "1" at 73.741,11.378 h1.27; Top Overlay "E" at 80.599,9.092 h1.27; Top Overlay "A" at 76.662,9.219 h1.27
U7: Top Assembly "A" at 67.456,0.719 h1.27 r90; Top Assembly "E" at 71.456,0.719 h1.27 r90; Top Assembly "1" at 64.135,3.672 h1.27 r180; Top Assembly "5" at 64.135,7.672 h1.27 r180; Top Overlay "A" at 66.662,0.719 h1.27; Top Overlay "E" at 70.599,0.592 h1.27; Top Overlay "1" at 63.741,2.878 h1.27; Top Overlay "5" at 63.614,6.815 h1.27
U8: Top Assembly "5" at 64.135,16.172 h1.27 r180; Top Assembly "1" at 64.135,12.172 h1.27 r180; Top Assembly "E" at 71.456,9.219 h1.27 r90; Top Assembly "A" at 67.456,9.219 h1.27 r90; Top Overlay "5" at 63.614,15.315 h1.27; Top Overlay "1" at 63.741,11.378 h1.27; Top Overlay "E" at 70.599,9.092 h1.27; Top Overlay "A" at 66.662,9.219 h1.27
U9: Top Assembly "A" at 57.456,0.719 h1.27 r90; Top Assembly "E" at 61.456,0.719 h1.27 r90; Top Assembly "1" at 54.135,3.672 h1.27 r180; Top Assembly "5" at 54.135,7.672 h1.27 r180; Top Overlay "A" at 56.662,0.719 h1.27; Top Overlay "E" at 60.599,0.592 h1.27; Top Overlay "1" at 53.741,2.878 h1.27; Top Overlay "5" at 53.614,6.815 h1.27
U10: Top Assembly "5" at 54.135,16.172 h1.27 r180; Top Assembly "1" at 54.135,12.172 h1.27 r180; Top Assembly "E" at 61.456,9.219 h1.27 r90; Top Assembly "A" at 57.456,9.219 h1.27 r90; Top Overlay "5" at 53.614,15.315 h1.27; Top Overlay "1" at 53.741,11.378 h1.27; Top Overlay "E" at 60.599,9.092 h1.27; Top Overlay "A" at 56.662,9.219 h1.27